# Altium PCB PCB1.PcbDoc (part 1 of 2)
Units mm, origin at the board's own origin, x right, y up, seen from the top; angles counter-clockwise.
Board outline 195 x 95 mm, 2 copper layers (Top Layer, Bottom Layer), stack 1.571 mm thick; 477 components, 312 nets, 1623 pads, 26 vias.
Unrouted connection lines stored in the file: 1219.
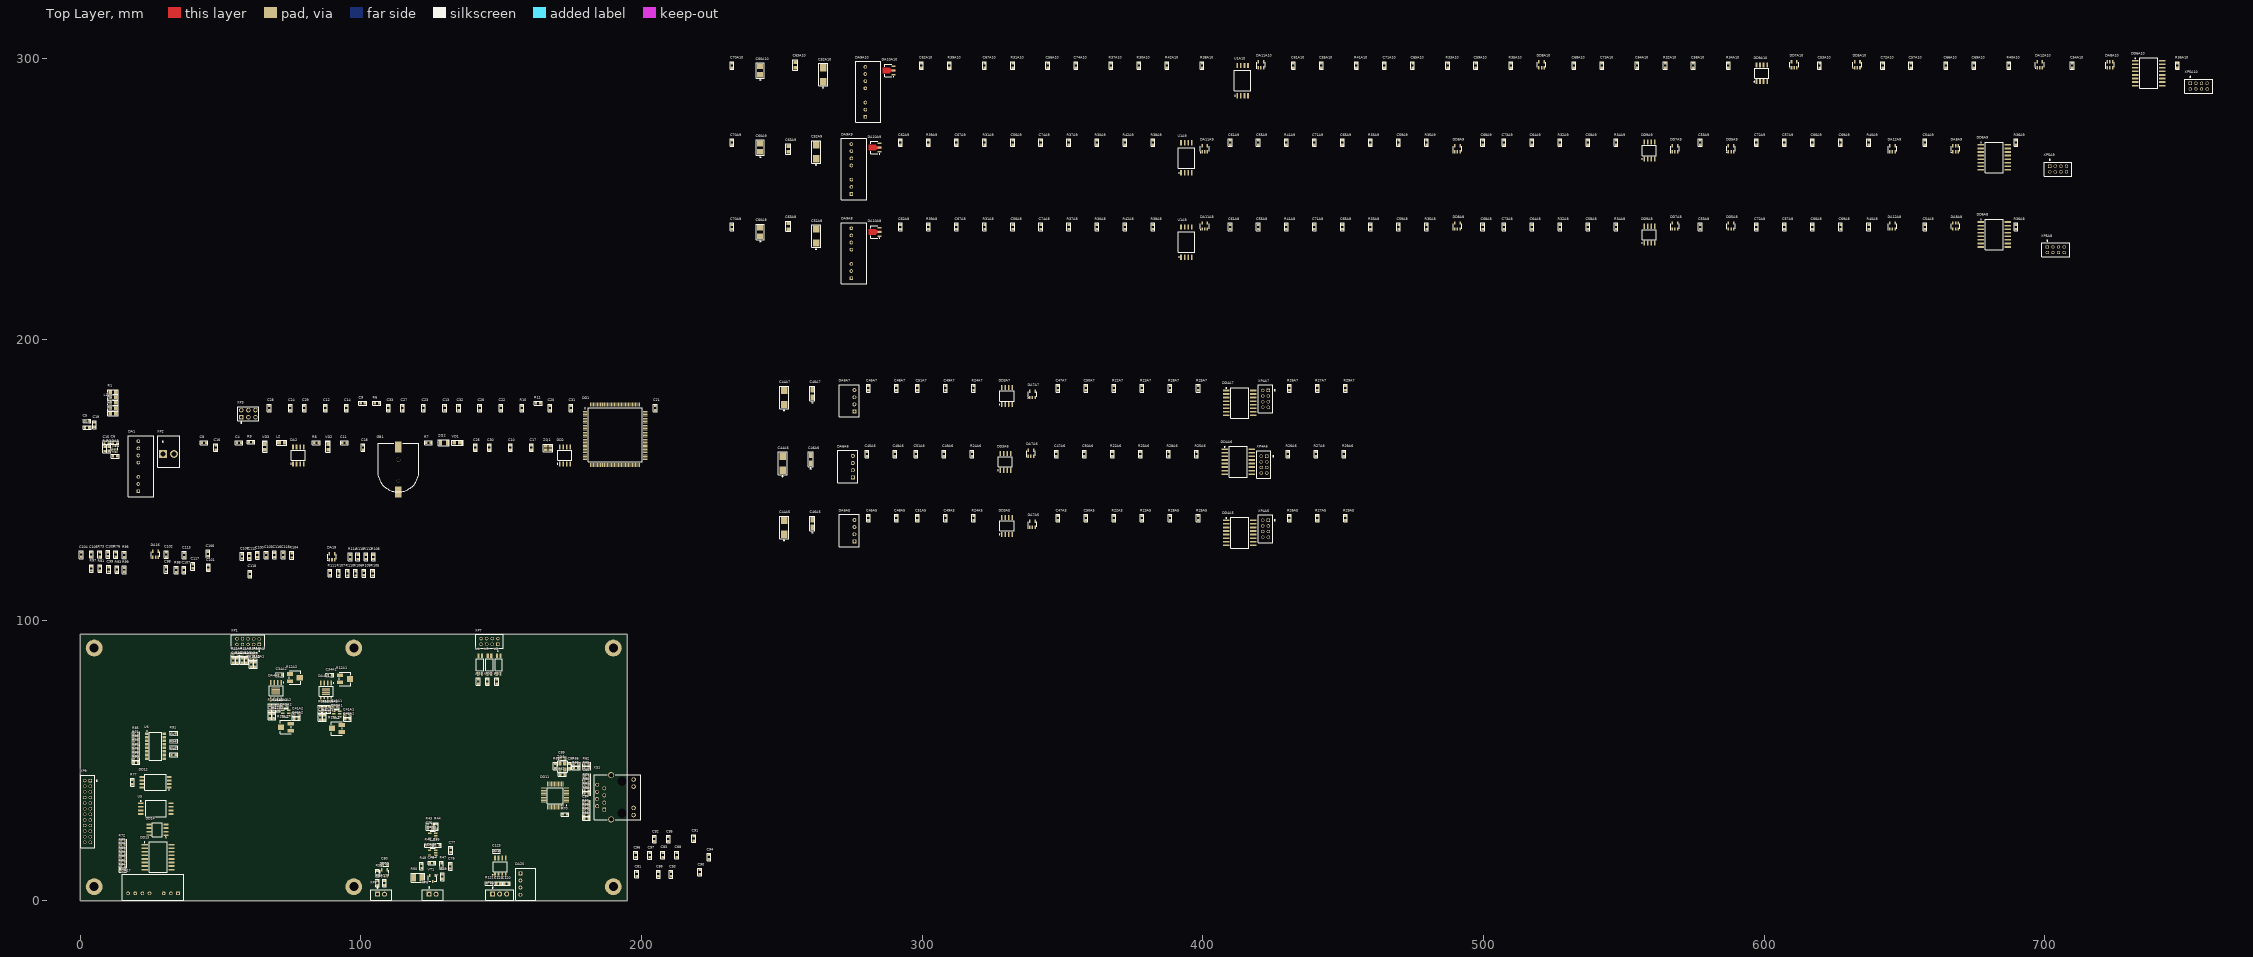
[diagram p0: Top Layer view]
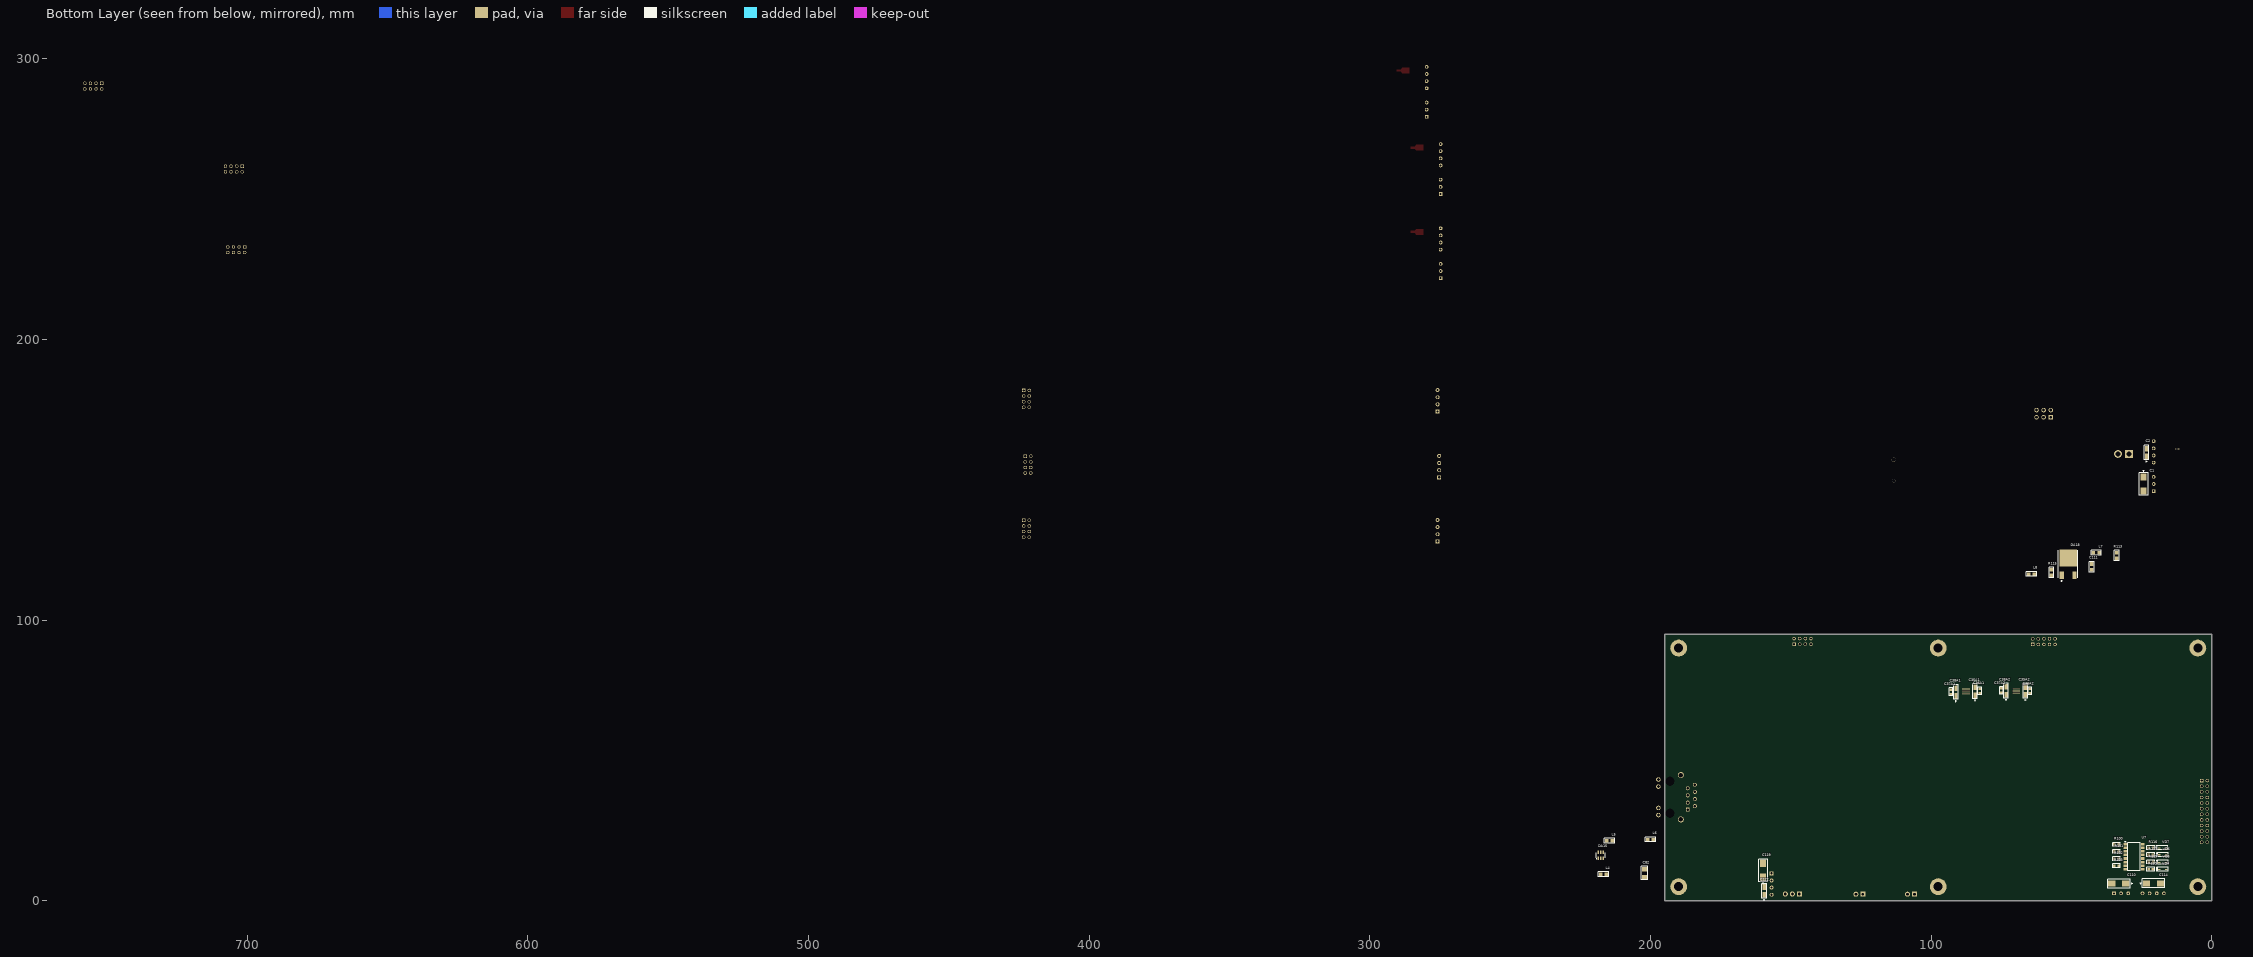
[diagram p1: Bottom Layer view, seen from below]

## Layer stack, top to bottom
Top Solder: solder mask 0.0102, Solder Resist, Dk 3.5
Top Layer: signal copper 0.0356
Dielectric 1: dielectric 1.5, FR-4, Dk 4.8
Bottom Layer: signal copper 0.0356
Bottom Solder: solder mask 0.0102, Solder Resist, Dk 3.5

## Board outline
0,0 195,0 195,95 0,95

## Design rules (kind name [scope] priority, off if disabled: settings)
BoardOutlineClearance [(OnLayer('Bottom Layer') AND OnLayer('Top Layer'))] p1: gap=0.2 ignorepadtopadclearanceinfootprint=FALSE
Clearance [All] p1: gap=0.2 ignorepadtopadclearanceinfootprint=TRUE except(0.3: SMDPad-Poly THPad-Poly)
DiffPairsRouting [All] p1: maxlimit=0.254 minlimit=0.254 mostfreqgap=0.254 toplayer_minwidth=0.381 toplayer_maxwidth=0.381 toplayer_prefwidth=0.381 bottomlayer_minwidth=0.381 bottomlayer_maxwidth=0.381 bottomlayer_prefwidth=0.381 maxuncoupledlength=12.7
Height [(OnLayer('Bottom Layer'))] p1: minheight=0 maxheight=3 prefheight=3
HoleSize [All] p1: absolutevalues=TRUE maxlimit=10 minlimit=0.2 maxpercent=80.000 minpercent=20.000
PlaneClearance [All] p1: clearance=0.5
PlaneConnect [All] p1: planeconnectstyle=Relief reliefexpansion=0.5 reliefentries=4 reliefconductorwidth=0.25 reliefairgap=0.25
PolygonConnect [All] p1: thpad.connectstyle=Relief thpad.reliefconductorwidth=0.5 thpad.reliefentries=4 thpad.polygonreliefangle="90 Angle" thpad.airgapwidth=0.25 smdpad.connectstyle=Relief smdpad.reliefconductorwidth=0.5 smdpad.reliefentries=4 smdpad.polygonreliefangle="90 Angle" smdpad.airgapwidth=0.25 via.connectstyle=Direct via.reliefconductorwidth=0.254 via.reliefentries=4 via.polygonreliefangle="90 Angle" via.airgapwidth=0.152
RoutingCorners [All] p1: cornerstyle=Round minsetback=0.254 maxsetback=2.54
RoutingVias [All] p1: holewidth=0.2 width=0.5 viastyle="Through Hole" minholewidth=0.2 minwidth=0.5 maxholewidth=1 maxwidth=1
SolderMaskExpansion [All] p1: expansion=0.102 istentingtop=FALSE
Width [All] p1: maxlimit=1 minlimit=0.2 preferedwidth=0.3 minimp=50.000000 maximp=50.000000 favimp=50.000000
24 further rules are at their usual default settings.

## Classes and differential pairs
differential pair class TD: TXO
differential pair class RD: RXI
channel class Thermistor: A3 A4
channel class Power_supply: A5 A6 A7
channel class Photodiode: A1 A2
channel class LD_driver: A8 A9 A10
component class Main: C1 C2 C3 C4 C5 C6 C7 C8 C9 C10 C11 C12 C13 C14 C15 C16 C17 C18 C19 C20 C21 C22 C23 C24 C25 C26 C27 C28 C29 C30 C31 C32 C33 DA1 DA2 DA3 DD1 DD2 GB1 L1 L2 L3 R1 R2 R3 R4 R5 R6 R7 R8 R9 R10 R11 VD1 VD2 VD3 XP1 XP2 XP3 ZQ1 ZQ2
component class A16: C119 C120 C121 C122 C123 DA20 DD15 R121 XP10
component class A15: C98 C99 C100 C101 C102 C103 C104 C105 C106 C107 C108 C109 C110 C111 C112 C113 C114 C115 C116 C117 C118 DA16 DA17 DA18 DA19 DD12 DD13 DD14 L7 L8 R71 R72 R73 R74 R75 R76 R77 R78 R79 R80 R81 R82 R83 R84 R85 R86 R87 R88 R89 R90 R91 R92 R93 R94 R95 R96 R97 R98 R99 R100 R101 R102 R103 R104 R105 R106 R107 R108 R109 R110 R111 R112 R113 R114 R115 R116 R117 R118 R119 R120 U5 U6 U7 VD4 VD5 VD6 VD7 XP9
component class A14: C81 C82 C83 C84 C85 C86 C87 C88 C89 C90 C91 C92 C93 C94 C95 C96 C97 DA15 DD11 L4 L5 L6 R56 R57 R58 R59 R60 R61 R62 R63 R64 R65 R66 R67 R68 R69 R70 XS1 ZQ3
component class A13: C79 C80 DD10 R54 R55 XP8
component class A12: R51 R52 R53 U2 U3 U4 XP7
component class A11: C75 C76 C77 C78 DA13 DA14 R43 R44 R45 R46 R47 R48 R49 R50 VT1 XP6
component class A10: C52A10 C53A10 C54A10 C55A10 C56A10 C57A10 C58A10 C59A10 C60A10 C61A10 C62A10 C63A10 C64A10 C65A10 C66A10 C67A10 C68A10 C69A10 C70A10 C71A10 C72A10 C73A10 C74A10 DA8A10 DA9A10 DA10A10 DA11A10 DA12A10 DD5A10 DD6A10 DD7A10 DD8A10 DD9A10 R30A10 R31A10 R32A10 R33A10 R34A10 R35A10 R36A10 R37A10 R38A10 R39A10 R40A10 R41A10 R42A10 U1A10 XP5A10
component class A9: C52A9 C53A9 C54A9 C55A9 C56A9 C57A9 C58A9 C59A9 C60A9 C61A9 C62A9 C63A9 C64A9 C65A9 C66A9 C67A9 C68A9 C69A9 C70A9 C71A9 C72A9 C73A9 C74A9 DA8A9 DA9A9 DA10A9 DA11A9 DA12A9 DD5A9 DD6A9 DD7A9 DD8A9 DD9A9 R30A9 R31A9 R32A9 R33A9 R34A9 R35A9 R36A9 R37A9 R38A9 R39A9 R40A9 R41A9 R42A9 U1A9 XP5A9
component class A8: C52A8 C53A8 C54A8 C55A8 C56A8 C57A8 C58A8 C59A8 C60A8 C61A8 C62A8 C63A8 C64A8 C65A8 C66A8 C67A8 C68A8 C69A8 C70A8 C71A8 C72A8 C73A8 C74A8 DA8A8 DA9A8 DA10A8 DA11A8 DA12A8 DD5A8 DD6A8 DD7A8 DD8A8 DD9A8 R30A8 R31A8 R32A8 R33A8 R34A8 R35A8 R36A8 R37A8 R38A8 R39A8 R40A8 R41A8 R42A8 U1A8 XP5A8
component class A7: C44A7 C45A7 C46A7 C47A7 C48A7 C49A7 C50A7 C51A7 DA6A7 DA7A7 DD3A7 DD4A7 R22A7 R23A7 R24A7 R25A7 R26A7 R27A7 R28A7 R29A7 XP4A7
component class A6: C44A6 C45A6 C46A6 C47A6 C48A6 C49A6 C50A6 C51A6 DA6A6 DA7A6 DD3A6 DD4A6 R22A6 R23A6 R24A6 R25A6 R26A6 R27A6 R28A6 R29A6 XP4A6
component class A5: C44A5 C45A5 C46A5 C47A5 C48A5 C49A5 C50A5 C51A5 DA6A5 DA7A5 DD3A5 DD4A5 R22A5 R23A5 R24A5 R25A5 R26A5 R27A5 R28A5 R29A5 XP4A5
component class A4: C43A4 R20A4 R21A4
component class A3: C43A3 R20A3 R21A3
component class A2: C34A2 C35A2 C36A2 C37A2 C38A2 C39A2 C40A2 C41A2 C42A2 DA4A2 DA5A2 R12A2 R13A2 R14A2 R15A2 R16A2 R17A2 R18A2 R19A2
component class A1: C34A1 C35A1 C36A1 C37A1 C38A1 C39A1 C40A1 C41A1 C42A1 DA4A1 DA5A1 R12A1 R13A1 R14A1 R15A1 R16A1 R17A1 R18A1 R19A1
differential pair TXO: +TXO_P -TXO_N
differential pair TD: +TD_P -TD_N
differential pair RXI: +RXI_P -RXI_N
differential pair RD: +RD_P -RD_N

## Components (designator, comment, footprint, x,y, rotation, side; value= is the part's Value field where it differs from the comment)
C1 "10мкФх35B" CAP_C 24.325,150.975 r270 bottom
C2 "10мкФх10B" CAP_A 23.3,158.275 r90 bottom
C3 "0,1мкФ" CAP_0603 1.7,168.575 r0 top
C4 "0,1мкФ" CAP_0603 55.85,163.15 r0 top
C5 "4,7мкФ" CAP_0603 1.625,170.925 r0 top
C6 "4,7мкФ" CAP_0603 11.625,163.275 r0 top
C7 "1мкФ" CAP_0603 13.3,158.325 r180 top
C8 "10мкФ" CAP_0603 43.35,163.15 r0 top
C9 "0,1мкФ" CAP_0603 99.9,177.25 r0 top
C10 "8пФ" CAP_0603 153.35,160.65 r90 top
C11 "18пФ" CAP_0603 93.35,163.15 r0 top
C12 "0,1мкФ" CAP_0603 87.4,174.75 r90 top
C13 "0,1мкФ" CAP_0603 129.9,174.75 r90 top
C14 "0,1мкФ" CAP_0603 94.9,174.75 r90 top
C15 "2,2мкФ" CAP_0603 10.275,163.25 r180 top
C16 "0,1мкФ" CAP_0603 48.35,160.65 r90 top
C17 "8пФ" CAP_0603 160.85,160.65 r90 top
C18 "18пФ" CAP_0603 100.85,160.65 r90 top
C19 "0,1мкФ" CAP_0603 5.15,168.8 r90 top
C20 "2,2мкФ" CAP_0603 167.4,174.75 r90 top
C21 "0,1мкФ" CAP_0603 204.9,174.75 r90 top
C22 "0,1мкФ" CAP_0603 149.9,174.75 r90 top
C23 "0,1мкФ" CAP_0603 122.4,174.75 r90 top
C24 "0,1мкФ" CAP_0603 74.9,174.75 r90 top
C25 "0,1мкФ" CAP_0603 140.85,160.65 r90 top
C26 "0,1мкФ" CAP_0603 142.4,174.75 r90 top
C27 "0,1мкФ" CAP_0603 114.9,174.75 r90 top
C28 "0,1мкФ" CAP_0603 67.4,174.75 r90 top
C29 "2,2мкФ" CAP_0603 79.9,174.75 r90 top
C30 "0,1мкФ" CAP_0603 145.85,160.65 r90 top
C31 "0,1мкФ" CAP_0603 174.9,174.75 r90 top
C32 "0,1мкФ" CAP_0603 134.9,174.75 r90 top
C33 "0,1мкФ" CAP_0603 109.9,174.75 r90 top
C34A1 "22пФ" CAP_0603 89.75,80.4 r180 top (schematic designator C34)
C34A2 "22пФ" CAP_0603 71.95,80.5 r180 top (schematic designator C34)
C35A1 "10мкФх10B" CAP_A 84.375,73.225 r90 bottom (schematic designator C35)
C35A2 "10мкФх10B" CAP_A 66.45,73.3 r90 bottom (schematic designator C35)
C36A1 "0,1мкФ" CAP_0603 82.725,75.525 r270 bottom (schematic designator C36)
C36A2 "0,1мкФ" CAP_0603 64.775,75.5 r270 bottom (schematic designator C36)
C37A1 "0,1мкФ" CAP_0603 92.975,73.6 r90 bottom (schematic designator C37)
C37A2 "0,1мкФ" CAP_0603 74.975,74.075 r90 bottom (schematic designator C37)
C38A1 "10мкФх10B" CAP_A 91.175,72.925 r90 bottom (schematic designator C38)
C38A2 "10мкФх10B" CAP_A 73.325,73.4 r90 bottom (schematic designator C38)
C39A1 "0,1мкФ" CAP_0603 85.575,64.425 r90 top (schematic designator C39)
C39A2 "0,1мкФ" CAP_0603 67.625,65 r90 top (schematic designator C39)
C40A1 "22пФ" CAP_0603 90.1,69.1 r0 top (schematic designator C40)
C40A2 "22пФ" CAP_0603 71.975,69.425 r0 top (schematic designator C40)
C41A1 "0,1мкФ" CAP_0603 94.425,66.05 r0 top (schematic designator C41)
C41A2 "0,1мкФ" CAP_0603 76.225,66.4 r0 top (schematic designator C41)
C42A1 "2,2мкФ" CAP_0603 94.425,64.6 r0 top (schematic designator C42)
C42A2 "2,2мкФ" CAP_0603 76.225,64.925 r0 top (schematic designator C42)
C43A3 "0,1мкФ" CAP_0603 57.775,86.375 r270 top (schematic designator C43)
C43A4 "0,1мкФ" CAP_0603 54.575,86.375 r270 top (schematic designator C43)
C44A5 "10мкФх35B" CAP_C 250.875,130.525 r90 top (schematic designator C44)
C44A6 "10мкФх35B" CAP_C 250.325,153.35 r90 top (schematic designator C44)
C44A7 "10мкФх35B" CAP_C 250.875,176.8 r90 top (schematic designator C44)
C45A5 "0,1мкФ" CAP_0603 280.875,135.525 r90 top (schematic designator C45)
C45A6 "0,1мкФ" CAP_0603 280.325,158.35 r90 top (schematic designator C45)
C45A7 "0,1мкФ" CAP_0603 280.875,181.8 r90 top (schematic designator C45)
C46A5 "10мкФх10B" CAP_A 260.875,133.025 r90 top (schematic designator C46)
C46A6 "10мкФх10B" CAP_A 260.325,155.85 r90 top (schematic designator C46)
C46A7 "10мкФх10B" CAP_A 260.875,179.3 r90 top (schematic designator C46)
C47A5 "0,1мкФ" CAP_0603 348.375,135.525 r90 top (schematic designator C47)
C47A6 "0,1мкФ" CAP_0603 347.825,158.35 r90 top (schematic designator C47)
C47A7 "0,1мкФ" CAP_0603 348.375,181.8 r90 top (schematic designator C47)
C48A5 "0,1мкФ" CAP_0603 290.875,135.525 r90 top (schematic designator C48)
C48A6 "0,1мкФ" CAP_0603 290.325,158.35 r90 top (schematic designator C48)
C48A7 "0,1мкФ" CAP_0603 290.875,181.8 r90 top (schematic designator C48)
C49A5 "10нФ" CAP_0603 308.375,135.525 r90 top (schematic designator C49)
C49A6 "10нФ" CAP_0603 307.825,158.35 r90 top (schematic designator C49)
C49A7 "10нФ" CAP_0603 308.375,181.8 r90 top (schematic designator C49)
C50A5 "0,1мкФ" CAP_0603 358.375,135.525 r90 top (schematic designator C50)
C50A6 "0,1мкФ" CAP_0603 357.825,158.35 r90 top (schematic designator C50)
C50A7 "0,1мкФ" CAP_0603 358.375,181.8 r90 top (schematic designator C50)
C51A5 "0,1мкФ" CAP_0603 298.375,135.525 r90 top (schematic designator C51)
C51A6 "0,1мкФ" CAP_0603 297.825,158.35 r90 top (schematic designator C51)
C51A7 "0,1мкФ" CAP_0603 298.375,181.8 r90 top (schematic designator C51)
C52A8 "10мкФх35B" CAP_C 262.275,234.3 r90 top (schematic designator C52)
C52A9 "10мкФх35B" CAP_C 262.275,264.3 r90 top (schematic designator C52)
C52A10 "10мкФх35B" CAP_C 264.775,291.8 r90 top (schematic designator C52)
C53A8 "0,1мкФ" CAP_0603 577.275,239.3 r90 top (schematic designator C53)
C53A9 "0,1мкФ" CAP_0603 577.275,269.3 r90 top (schematic designator C53)
C53A10 "0,1мкФ" CAP_0603 619.775,296.8 r90 top (schematic designator C53)
C54A8 "0,1мкФ" CAP_0603 657.275,239.3 r90 top (schematic designator C54)
C54A9 "0,1мкФ" CAP_0603 657.275,269.3 r90 top (schematic designator C54)
C54A10 "0,1мкФ" CAP_0603 709.775,296.8 r90 top (schematic designator C54)
C55A8 "0,1мкФ" CAP_0603 419.775,239.3 r90 top (schematic designator C55)
C55A9 "0,1мкФ" CAP_0603 419.775,269.3 r90 top (schematic designator C55)
C55A10 "0,1мкФ" CAP_0603 442.275,296.8 r90 top (schematic designator C55)
C56A8 "100пФ" CAP_0603 332.275,239.3 r90 top (schematic designator C56)
C56A9 "100пФ" CAP_0603 332.275,269.3 r90 top (schematic designator C56)
C56A10 "100пФ" CAP_0603 344.775,296.8 r90 top (schematic designator C56)
C57A8 "0,1мкФ" CAP_0603 607.275,239.3 r90 top (schematic designator C57)
C57A9 "0,1мкФ" CAP_0603 607.275,269.3 r90 top (schematic designator C57)
C57A10 "0,1мкФ" CAP_0603 652.275,296.8 r90 top (schematic designator C57)
C58A8 "1мкФ" CAP_0603 537.275,239.3 r90 top (schematic designator C58)
C58A9 "1мкФ" CAP_0603 537.275,269.3 r90 top (schematic designator C58)
C58A10 "1мкФ" CAP_0603 574.775,296.8 r90 top (schematic designator C58)
C59A8 "1мкФ" CAP_0603 469.775,239.3 r90 top (schematic designator C59)
C59A9 "1мкФ" CAP_0603 469.775,269.3 r90 top (schematic designator C59)
C59A10 "1мкФ" CAP_0603 497.275,296.8 r90 top (schematic designator C59)
C60A8 "10мкФх25B" CAP_B 242.275,236.8 r90 top (schematic designator C60)
C60A9 "10мкФх25B" CAP_B 242.275,266.8 r90 top (schematic designator C60)
C60A10 "10мкФх25B" CAP_B 242.275,294.3 r90 top (schematic designator C60)
C61A8 "0,1мкФ" CAP_0603 409.775,239.3 r90 top (schematic designator C61)
C61A9 "0,1мкФ" CAP_0603 409.775,269.3 r90 top (schematic designator C61)
C61A10 "0,1мкФ" CAP_0603 432.275,296.8 r90 top (schematic designator C61)
C62A8 "100пФ" CAP_0603 292.275,239.3 r90 top (schematic designator C62)
C62A9 "100пФ" CAP_0603 292.275,269.3 r90 top (schematic designator C62)
C62A10 "100пФ" CAP_0603 299.775,296.8 r90 top (schematic designator C62)
C63A8 "0,33мкФ" CAP_0805 252.275,239.3 r90 top (schematic designator C63)
C63A9 "0,33мкФ" CAP_0805 252.275,266.8 r90 top (schematic designator C63)
C63A10 "0,33мкФ" CAP_0805 254.775,296.8 r90 top (schematic designator C63)
C64A8 "0,1мкФ" CAP_0603 517.275,239.3 r90 top (schematic designator C64)
C64A9 "0,1мкФ" CAP_0603 517.275,269.3 r90 top (schematic designator C64)
C64A10 "0,1мкФ" CAP_0603 554.775,296.8 r90 top (schematic designator C64)
C65A8 "0,1мкФ" CAP_0603 449.775,239.3 r90 top (schematic designator C65)
C65A9 "0,1мкФ" CAP_0603 449.775,269.3 r90 top (schematic designator C65)
C65A10 "0,1мкФ" CAP_0603 474.775,296.8 r90 top (schematic designator C65)
C66A8 "0,1мкФ" CAP_0603 617.275,239.3 r90 top (schematic designator C66)
C66A9 "0,1мкФ" CAP_0603 617.275,269.3 r90 top (schematic designator C66)
C66A10 "0,1мкФ" CAP_0603 664.775,296.8 r90 top (schematic designator C66)
C67A8 "0,1мкФ" CAP_0603 312.275,239.3 r90 top (schematic designator C67)
C67A9 "0,1мкФ" CAP_0603 312.275,269.3 r90 top (schematic designator C67)
C67A10 "0,1мкФ" CAP_0603 322.275,296.8 r90 top (schematic designator C67)
C68A8 "0,1мкФ" CAP_0603 499.775,239.3 r90 top (schematic designator C68)
C68A9 "0,1мкФ" CAP_0603 499.775,269.3 r90 top (schematic designator C68)
C68A10 "0,1мкФ" CAP_0603 532.275,296.8 r90 top (schematic designator C68)
C69A8 "10нФ" CAP_0603 627.275,239.3 r90 top (schematic designator C69)
C69A9 "10нФ" CAP_0603 627.275,269.3 r90 top (schematic designator C69)
C69A10 "10нФ" CAP_0603 674.775,296.8 r90 top (schematic designator C69)
C70A8 "0,1мкФ" CAP_0603 232.275,239.3 r90 top (schematic designator C70)
C70A9 "0,1мкФ" CAP_0603 232.275,269.3 r90 top (schematic designator C70)
C70A10 "0,1мкФ" CAP_0603 232.275,296.8 r90 top (schematic designator C70)
C71A8 "100пФ" CAP_0603 439.775,239.3 r90 top (schematic designator C71)
C71A9 "100пФ" CAP_0603 439.775,269.3 r90 top (schematic designator C71)
C71A10 "100пФ" CAP_0603 464.775,296.8 r90 top (schematic designator C71)
C72A8 "0,1мкФ" CAP_0603 597.275,239.3 r90 top (schematic designator C72)
C72A9 "0,1мкФ" CAP_0603 597.275,269.3 r90 top (schematic designator C72)
C72A10 "0,1мкФ" CAP_0603 642.275,296.8 r90 top (schematic designator C72)
C73A8 "0,1мкФ" CAP_0603 507.275,239.3 r90 top (schematic designator C73)
C73A9 "0,1мкФ" CAP_0603 507.275,269.3 r90 top (schematic designator C73)
C73A10 "0,1мкФ" CAP_0603 542.275,296.8 r90 top (schematic designator C73)
C74A8 "0,1мкФ" CAP_0603 342.275,239.3 r90 top (schematic designator C74)
C74A9 "0,1мкФ" CAP_0603 342.275,269.3 r90 top (schematic designator C74)
C74A10 "0,1мкФ" CAP_0603 354.775,296.8 r90 top (schematic designator C74)
C75 "1мкФ" CAP_0603 125.425,25.725 r180 top
C76 "0,1мкФ" CAP_0603 131.925,11.45 r90 top
C77 "0,1мкФ" CAP_0603 132.05,17.2 r90 top
C78 "100пФ" CAP_0603 126.15,13.375 r180 top
C79 "1мкФ" CAP_0603 108.475,7.075 r270 top
C80 "0,1мкФ" CAP_0603 107.85,12.9 r0 top
C81 "0,1мкФ" CAP_0603 198.325,8.7 r90 top
C82 "1нФх2кВ" CAP_1206 202.15,8.4 r90 bottom
C83 "0,1мкФ" CAP_0603 207.6,15.475 r90 top
C84 "0,1мкФ" CAP_0603 179.625,35.15 r0 top
C85 "0,1мкФ" CAP_0603 179.775,44.525 r0 top
C86 "0,1мкФ" CAP_0603 206.075,8.65 r90 top
C87 "8пФ" CAP_0603 174.375,47.175 r90 top locked
C88 "0,1мкФ" CAP_0603 212.6,15.475 r90 top
C89 "8пФ" CAP_0603 171.025,50.7 r0 top locked
C90 "0,1мкФ" CAP_0603 220.775,9.375 r90 top
C91 "0,1мкФ" CAP_0603 218.65,21.375 r90 top
C92 "0,1мкФ" CAP_0603 204.6,21.175 r90 top
C93 "0,1мкФ" CAP_0603 210.575,8.65 r90 top
C94 "0,1мкФ" CAP_0603 224.025,14.725 r90 top
C95 "0,1мкФ" CAP_0603 209.6,21.175 r90 top
C96 "0,1мкФ" CAP_0603 197.975,15.4 r90 top
C97 "0,1мкФ" CAP_0603 202.975,15.4 r90 top
C98 "0,1мкФ" CAP_0603 30.65,117.25 r90 top
C99 "100пФ" CAP_0603 10.175,117.25 r90 top
C100 "0,1мкФ" CAP_0603 63.2,122.3 r90 top
C101 "0,1мкФ" CAP_0603 45.75,117.875 r90 top
C102 "0,1мкФ" CAP_0603 30.675,122.55 r90 top
C103 "0,1мкФ" CAP_0603 66.325,122.375 r90 top
C104 "100пФ" CAP_0603 0.4,122.475 r90 top
C105 "0,1мкФ" CAP_0603 4,122.525 r90 top
C106 "0,1мкФ" CAP_0603 45.5,122.775 r90 top
C107 "100пФ" CAP_0603 36.95,117 r90 top
C108 "0,1мкФ" CAP_0603 57.725,121.9 r90 top
C109 "0,1мкФ" CAP_0603 9.9,122.625 r90 top
C110 "10мкФх35B" CAP_C 30.65,6.1 r0 bottom
C111 "0,33мкФ" CAP_0805 42.775,117.95 r90 bottom
C112 "0,1мкФ" CAP_0603 60.375,121.95 r90 top
C113 "0,1мкФ" CAP_0603 37.125,122.325 r90 top
C114 "10мкФх35B" CAP_C 23.3,6.125 r180 bottom
C115 "1мкФ" CAP_0603 72.35,122.425 r90 top
C116 "0,1мкФ" CAP_0603 69.275,122.425 r90 top
C117 "0,1мкФ" CAP_0603 40.125,118.35 r90 top
C118 "0,1мкФ" CAP_0603 60.5,115.6 r90 top
C119 "10мкФх35B" CAP_C 159.9,8.3 r90 bottom
C120 "0,1мкФ" CAP_0603 151.15,6.1 r0 top
C121 "0,1мкФ" CAP_0603 149.775,6.1 r180 top
C122 "10мкФх10B" CAP_A 159.5,2.05 r90 bottom
C123 "0,1мкФ" CAP_0603 147.55,17.625 r0 top
DA1 "TMR 6-2411" "TMR3 (SIP-8)" 20.725,145.92 r90 top
DA2 "LD1117D33CTR" SOIC-8 75.85,155.65 r90 top
DA3 "LM27761DSGR" WSON-8 13.125,161.95 r270 top
DA4A1 "ADA4817-1ARDZ" "SOIC-8 EPAD" 89.5,77.6 r270 top (schematic designator DA4)
DA4A2 "ADA4817-1ARDZ" "SOIC-8 EPAD" 71.675,77.725 r270 top (schematic designator DA4)
DA5A1 "TLV3501AIDBVR" SOT-23-6 90.325,67.5 r0 top (schematic designator DA5)
DA5A2 "TLV3501AIDBVR" SOT-23-6 72.2,67.8 r0 top (schematic designator DA5)
DA6A5 "TME 2405S" "TME (SIP-4)" 275.875,128.025 r90 top (schematic designator DA6)
DA6A6 "TME 2405S" "TME (SIP-4)" 275.325,150.85 r90 top (schematic designator DA6)
DA6A7 "TME 2405S" "TME (SIP-4)" 275.875,174.3 r90 top (schematic designator DA6)
DA7A5 "LMC7101BIM5" SOT-23-5 338.375,133.025 r90 top (schematic designator DA7)
DA7A6 "LMC7101BIM5" SOT-23-5 337.825,158.35 r90 top (schematic designator DA7)
DA7A7 "LMC7101BIM5" SOT-23-5 338.375,179.3 r90 top (schematic designator DA7)
DA8A8 "SN74LVC1G3157DBV" SOT-23-6 667.275,239.3 r90 top (schematic designator DA8)
DA8A9 "SN74LVC1G3157DBV" SOT-23-6 667.275,266.8 r90 top (schematic designator DA8)
DA8A10 "SN74LVC1G3157DBV" SOT-23-6 722.275,296.8 r90 top (schematic designator DA8)
DA9A8 "TMR 2412" "TMR3 (SIP-8)" 274.775,221.8 r90 top (schematic designator DA9)
DA9A9 "TMR 2412" "TMR3 (SIP-8)" 274.775,251.8 r90 top (schematic designator DA9)
DA9A10 "TMR 2412" "TMR3 (SIP-8)" 279.775,279.3 r90 top (schematic designator DA9)
DA10A8 "L78L05ABUTR" SOT-89 284.775,236.8 r90 top (schematic designator DA10)
DA10A9 "L78L05ABUTR" SOT-89 284.775,266.8 r90 top (schematic designator DA10)
DA10A10 "L78L05ABUTR" SOT-89 289.775,294.3 r90 top (schematic designator DA10)
DA11A8 "LMC7101BIM5" SOT-23-5 399.775,239.3 r90 top (schematic designator DA11)
DA11A9 "LMC7101BIM5" SOT-23-5 399.775,266.8 r90 top (schematic designator DA11)
DA11A10 "LMC7101BIM5" SOT-23-5 419.775,296.8 r90 top (schematic designator DA11)
DA12A8 "LMC7101BIM5" SOT-23-5 644.775,239.3 r90 top (schematic designator DA12)
DA12A9 "LMC7101BIM5" SOT-23-5 644.775,266.8 r90 top (schematic designator DA12)
DA12A10 "LMC7101BIM5" SOT-23-5 697.275,296.8 r90 top (schematic designator DA12)
DA13 "LMC7101BIM5" SOT-23-5 126.775,22.175 r180 top
DA14 "LMC7101BIM5" SOT-23-5 126.65,16.125 r180 top
DA15 "TPD4S009DBVR" SOT-23-6 218.7,15.125 r90 bottom
DA16 "LMC7101BIM5" SOT-23-5 25.925,122.35 r90 top
DA17 "TMR 4-2415" "TMR4 (SIP-8)" 34.88,2.625 r180 top
DA18 "L78M05CDT-TR" TO-252 53.5,115.95 r180 bottom
DA19 "LM7301IM5X/NOPB" SOT-23-5 88.8,121.425 r90 top
DA20 "TME 2405S" "TME (SIP-4)" 156.875,9.73 r270 top
DD1 "STM32F405ZGT6" LQFP-144 179.9,174.75 r0 top
DD2 "W25Q16JVSNIQ" SOIC-8 170.85,155.65 r90 top
DD3A5 "ADUM1100BR" SOIC-8 328.375,130.525 r90 top (schematic designator DD3)
DD3A6 "ADUM1100BR" SOIC-8 327.825,153.35 r90 top (schematic designator DD3)
DD3A7 "ADUM1100BR" SOIC-8 328.375,176.8 r90 top (schematic designator DD3)
DD4A5 "ADUM1401CRW" SOIC-16W 408.375,135.525 r0 top (schematic designator DD4)
DD4A6 "ADUM1401CRW" SOIC-16W 407.825,160.85 r0 top (schematic designator DD4)
DD4A7 "ADUM1401CRW" SOIC-16W 408.375,181.8 r0 top (schematic designator DD4)
DD5A8 "SN74LVC1G08DBV" SOT-23-5 587.275,239.3 r90 top (schematic designator DD5)
DD5A9 "SN74LVC1G08DBV" SOT-23-5 587.275,266.8 r90 top (schematic designator DD5)
DD5A10 "SN74LVC1G08DBV" SOT-23-5 632.275,296.8 r90 top (schematic designator DD5)
DD6A8 "ADUM1400CRW" SOIC-16W 677.275,241.8 r0 top (schematic designator DD6)
DD6A9 "ADUM1400CRW" SOIC-16W 677.275,269.3 r0 top (schematic designator DD6)
DD6A10 "ADUM1400CRW" SOIC-16W 732.275,299.3 r0 top (schematic designator DD6)
DD7A8 "SN74LVC1G17DBV" SOT-23-5 567.275,239.3 r90 top (schematic designator DD7)
DD7A9 "SN74LVC1G17DBV" SOT-23-5 567.275,266.8 r90 top (schematic designator DD7)
DD7A10 "SN74LVC1G17DBV" SOT-23-5 609.775,296.8 r90 top (schematic designator DD7)
DD8A8 "SN74LVC1G17DBV" SOT-23-5 489.775,239.3 r90 top (schematic designator DD8)
DD8A9 "SN74LVC1G17DBV" SOT-23-5 489.775,266.8 r90 top (schematic designator DD8)
DD8A10 "SN74LVC1G17DBV" SOT-23-5 519.775,296.8 r90 top (schematic designator DD8)
DD9A8 "ADUM1200CR" SOIC-8 557.275,234.3 r90 top (schematic designator DD9)
DD9A9 "ADUM1200CR" SOIC-8 557.275,264.3 r90 top (schematic designator DD9)
DD9A10 "ADUM1200CR" SOIC-8 597.275,291.8 r90 top (schematic designator DD9)
DD10 "SN74LVC1G17DBV" SOT-23-5 107.525,8.8 r90 top
DD11 "W5100S-L" LQFP-48 173.3,34.7 r180 top locked
DD12 "ADM3050EBRIZ" "SOIC-8 RI-8-1" 31.7,40.305 r180 top
DD13 "ADUM1400CRW" SOIC-16W 22.95,19.955 r0 top
DD14 "ADUM1100BR" SOIC-8 30.55,23.325 r180 top
DD15 "ADUM1100BR" SOIC-8 147.8,9.15 r90 top
GB1 "DS1092-12-N8S" DS1092-12-N8S 113.35,145.65 r90 top
L1 "BLM21PG221SN1D" IND_0805 12.75,179.325 r180 top
L2 "BLM21PG221SN1D" IND_0805 70.85,163.15 r0 top
L3 "BLM21PG221SN1D" IND_0805 12.75,175.475 r180 top
L4 "BLM21PG221SN1D" IND_0805 217.775,9.375 r180 bottom
L5 "BLM21PG221SN1D" IND_0805 215.65,21.375 r180 bottom
L6 "BLM21PG221SN1D" IND_0805 201,21.775 r180 bottom
L7 "BLM21PG221SN1D" IND_0805 42.2,123.95 r180 bottom
L8 "BLM21PG221SN1D" IND_0805 65.3,116.375 r180 bottom
R1 "0" RES_0805 10.75,181.25 r0 top
R2 "0" RES_0805 12.75,177.4 r180 top
R3 "133к" RES_0603 10.225,160.225 r90 top
R4 "50к" RES_0603 8.75,161.8 r270 top
R5 "0" RES_0805 12.75,173.55 r180 top
R6 "10к" RES_0603 104.9,177.25 r0 top
R7 "200" RES_0603 123.35,163.15 r0 top
R8 "200" RES_0603 83.35,163.15 r0 top
R9 "200" RES_0603 60.125,163.4 r0 top
R10 "10к" RES_0603 157.4,174.75 r90 top
R11 "0" RES_0603 162.4,177.25 r0 top
R12A1 "2М" 3224W 92.65,80.3 r180 top (schematic designator R12)
R12A2 "2М" 3224W 74.8,80.75 r180 top (schematic designator R12)
R13A1 "0" RES_0603 62.45,83.375 r90 top (schematic designator R13)
R13A2 "0" RES_0603 60.975,83.35 r90 top (schematic designator R13)
R14A1 "DNP" RES_0603 62.425,86.3 r90 top (schematic designator R14)
R14A2 "DNP" RES_0603 60.975,86.275 r90 top (schematic designator R14)
R15A1 "5,1к" RES_0603 87.075,69.025 r270 top (schematic designator R15)
R15A2 "5,1к" RES_0603 69.1,69.525 r270 top (schematic designator R15)
R16A1 "10к" RES_0603 85.525,67.425 r90 top (schematic designator R16)
R16A2 "10к" RES_0603 67.625,67.925 r90 top (schematic designator R16)
R17A1 "10к" RES_0603 87.075,66.025 r270 top (schematic designator R17)
R17A2 "10к" RES_0603 69.1,66.6 r270 top (schematic designator R17)
R18A1 "10к" RES_0603 88.575,67.425 r90 top (schematic designator R18)
R18A2 "10к" RES_0603 70.575,67.9 r90 top (schematic designator R18)
R19A1 "10к" 3224W 93.2,60.075 r0 top (schematic designator R19)
R19A2 "10к" 3224W 75.025,60.55 r0 top (schematic designator R19)
R20A3 "10к" RES_0603 59.225,84.775 r90 top (schematic designator R20)
R20A4 "10к" RES_0603 56.025,84.775 r90 top (schematic designator R20)
R21A3 "10к" RES_0603 59.3,87.75 r180 top (schematic designator R21)
R21A4 "10к" RES_0603 56.1,87.75 r180 top (schematic designator R21)
R22A5 "10к" RES_0603 368.375,135.525 r90 top (schematic designator R22)
R22A6 "10к" RES_0603 367.825,158.35 r90 top (schematic designator R22)
R22A7 "10к" RES_0603 368.375,181.8 r90 top (schematic designator R22)
R23A5 "DNP" RES_0603 378.375,135.525 r90 top (schematic designator R23)
R23A6 "DNP" RES_0603 377.825,158.35 r90 top (schematic designator R23)
R23A7 "DNP" RES_0603 378.375,181.8 r90 top (schematic designator R23)
R24A5 "10к" RES_0603 318.375,135.525 r90 top (schematic designator R24)
R24A6 "10к" RES_0603 317.825,158.35 r90 top (schematic designator R24)
R24A7 "10к" RES_0603 318.375,181.8 r90 top (schematic designator R24)
R25A5 "2,4к" RES_0603 398.375,135.525 r90 top (schematic designator R25)
R25A6 "2,4к" RES_0603 397.825,158.35 r90 top (schematic designator R25)
R25A7 "2,4к" RES_0603 398.375,181.8 r90 top (schematic designator R25)
R26A5 "10к" RES_0603 430.875,135.525 r90 top (schematic designator R26)
R26A6 "10к" RES_0603 430.325,158.35 r90 top (schematic designator R26)
R26A7 "10к" RES_0603 430.875,181.8 r90 top (schematic designator R26)
R27A5 "10к" RES_0603 440.875,135.525 r90 top (schematic designator R27)
R27A6 "10к" RES_0603 440.325,158.35 r90 top (schematic designator R27)
R27A7 "10к" RES_0603 440.875,181.8 r90 top (schematic designator R27)
R28A5 "10к" RES_0603 388.375,135.525 r90 top (schematic designator R28)
R28A6 "10к" RES_0603 387.825,158.35 r90 top (schematic designator R28)
R28A7 "10к" RES_0603 388.375,181.8 r90 top (schematic designator R28)
R29A5 "10к" RES_0603 450.875,135.525 r90 top (schematic designator R29)
R29A6 "10к" RES_0603 450.325,158.35 r90 top (schematic designator R29)
R29A7 "10к" RES_0603 450.875,181.8 r90 top (schematic designator R29)
R30A8 "15к" RES_0603 362.275,239.3 r90 top (schematic designator R30)
R30A9 "15к" RES_0603 362.275,269.3 r90 top (schematic designator R30)
R30A10 "15к" RES_0603 377.275,296.8 r90 top (schematic designator R30)
R31A8 "10к" RES_0603 322.275,239.3 r90 top (schematic designator R31)
R31A9 "10к" RES_0603 322.275,269.3 r90 top (schematic designator R31)
R31A10 "10к" RES_0603 332.275,296.8 r90 top (schematic designator R31)
R32A8 "10к" RES_0603 527.275,239.3 r90 top (schematic designator R32)
R32A9 "10к" RES_0603 527.275,269.3 r90 top (schematic designator R32)
R32A10 "10к" RES_0603 564.775,296.8 r90 top (schematic designator R32)
R33A8 "10к" RES_0603 459.775,239.3 r90 top (schematic designator R33)
R33A9 "10к" RES_0603 459.775,269.3 r90 top (schematic designator R33)
R33A10 "10к" RES_0603 487.275,296.8 r90 top (schematic designator R33)
R34A8 "10к" RES_0603 547.275,239.3 r90 top (schematic designator R34)
R34A9 "10к" RES_0603 547.275,269.3 r90 top (schematic designator R34)
R34A10 "10к" RES_0603 587.275,296.8 r90 top (schematic designator R34)
R35A8 "10к" RES_0603 479.775,239.3 r90 top (schematic designator R35)
R35A9 "10к" RES_0603 479.775,269.3 r90 top (schematic designator R35)
R35A10 "10к" RES_0603 509.775,296.8 r90 top (schematic designator R35)
R36A8 "10к" RES_0603 689.775,239.3 r90 top (schematic designator R36)
R36A9 "10к" RES_0603 689.775,269.3 r90 top (schematic designator R36)
R36A10 "10к" RES_0603 747.275,296.8 r90 top (schematic designator R36)
R37A8 "10к" RES_0603 352.275,239.3 r90 top (schematic designator R37)
R37A9 "10к" RES_0603 352.275,269.3 r90 top (schematic designator R37)
R37A10 "10к" RES_0603 367.275,296.8 r90 top (schematic designator R37)
R38A8 "10к" RES_0603 382.275,239.3 r90 top (schematic designator R38)
R38A9 "10к" RES_0603 382.275,269.3 r90 top (schematic designator R38)
R38A10 "10к" RES_0603 399.775,296.8 r90 top (schematic designator R38)
R39A8 "16,5к" RES_0603 302.275,239.3 r90 top (schematic designator R39)
R39A9 "16,5к" RES_0603 302.275,269.3 r90 top (schematic designator R39)
R39A10 "16,5к" RES_0603 309.775,296.8 r90 top (schematic designator R39)
R40A8 "10к" RES_0603 637.275,239.3 r90 top (schematic designator R40)
R40A9 "10к" RES_0603 637.275,269.3 r90 top (schematic designator R40)
R40A10 "10к" RES_0603 687.275,296.8 r90 top (schematic designator R40)
R41A8 "16,5к" RES_0603 429.775,239.3 r90 top (schematic designator R41)
R41A9 "16,5к" RES_0603 429.775,269.3 r90 top (schematic designator R41)
R41A10 "16,5к" RES_0603 454.775,296.8 r90 top (schematic designator R41)
R42A8 "10к" RES_0603 372.275,239.3 r90 top (schematic designator R42)
R42A9 "10к" RES_0603 372.275,269.3 r90 top (schematic designator R42)
R42A10 "10к" RES_0603 387.275,296.8 r90 top (schematic designator R42)
R43 "10к" RES_0603 123.85,27.2 r0 top
R44 "10к" RES_0603 126.975,27.225 r270 top
R45 "12к" RES_0603 128.15,19.75 r180 top
R46 "10к" RES_0603 125,19.7 r180 top
R47 "200" RES_0603 128.8,13.4 r270 top
R48 "10к" RES_0603 121.675,13.2 r270 top
R49 "10к" RES_0603 129.075,7.75 r90 top
R50 "10" RES_1210 118.975,8.225 r0 top
R51 "200" RES_0603 148.45,78.9 r270 top
R52 "200" RES_0603 145.175,78.9 r270 top
R53 "200" RES_0603 141.875,78.9 r270 top
R54 "1к" RES_0603 105.975,5.475 r90 top
R55 "10к" RES_0603 105.975,9.025 r90 top
R56 "49,9" RES_0603 181.225,29.25 r180 top
R57 "49,9" RES_0603 181.225,33.675 r180 top
R58 "49,9" RES_0603 181.275,38.15 r180 top
R59 "49,9" RES_0603 181.3,42.725 r180 top
R60 "3,3" RES_0603 179.625,30.725 r0 top
R61 "3,3" RES_0603 179.675,39.625 r0 top
R62 "1к" RES_0603 181.3,48.712 r180 top locked
R63 "3,3" RES_0603 179.625,32.2 r0 top
R64 "3,3" RES_0603 179.7,41.25 r0 top
R65 "1к" RES_0603 181.3,47.212 r180 top locked
R66 "300" RES_0603 175.95,48.712 r0 top locked
R67 "1М" RES_0603 172.6,44.9 r180 top locked
R68 "12к" RES_0603 177.55,47.212 r180 top locked
R69 "0" RES_0603 169.3,47.175 r90 top
R70 "10к" RES_0603 172,30.75 r0 top locked
R71 "10к" RES_0603 20.75,58.1 r180 top
R72 "10к" RES_0603 16.075,21.225 r180 top
R73 "10к" RES_0603 6.975,122.55 r90 top
R74 "10к" RES_0603 20.75,55.15 r180 top
R75 "10к" RES_0603 16.075,18.275 r180 top
R76 "40,2к" RES_0603 12.675,122.55 r90 top
R77 "120" RES_0603 18.625,43.025 r270 top
R78 "10к" RES_0603 20.75,52.2 r180 top
R79 "10к" RES_0603 16.1,15.3 r180 top
R80 "10к" RES_0603 20.75,49.25 r180 top
R81 "10к" RES_0603 7.05,117.525 r90 top
R82 "10к" RES_0603 16.1,12.3 r180 top
R83 "10к" RES_0603 14.5,16.8 r0 top
R84 "10к" RES_0603 14.5,10.8 r0 top
R85 "390" RES_0603 19.15,59.55 r0 top
R86 "390" RES_0603 19.15,56.625 r0 top
R87 "390" RES_0603 19.15,53.675 r0 top
R88 "390" RES_0603 19.15,50.725 r0 top
R89 "10к" RES_0603 14.475,19.75 r0 top
R90 "10к" RES_0603 14.5,13.825 r0 top
R91 "10к" RES_0603 34.125,59.65 r180 top
R92 "10к" RES_0603 34.125,56.925 r180 top
R93 "10к" RES_0603 13.1,117.2 r90 top
R94 "10к" RES_0603 34.125,54.625 r180 top
R95 "10к" RES_0603 15.7,122.375 r90 top
R96 "10к" RES_0603 34.125,51.975 r180 top
R97 "16,5к" RES_0603 4.075,117.6 r90 top
R98 "16,5к" RES_0603 34.275,117 r90 top
R99 "10к" RES_0603 15.7,117.1 r90 top
R100 "200" RES_0603 33.175,20.05 r0 bottom
R101 "200" RES_0603 33.15,17.5 r0 bottom
R102 "200" RES_0603 33.15,14.925 r0 bottom
R103 "200" RES_0603 33.15,12.425 r0 bottom
R104 "10к" RES_0603 75.425,122.25 r90 top
R105 "0" RES_0603 104.25,115.85 r90 top
R106 "0" RES_0603 98.15,115.85 r90 top
R107 "0" RES_0603 92.1,115.825 r90 top
R108 "0" RES_0603 104.525,121.7 r90 top
R109 "DNP" RES_0603 101.175,115.875 r90 top
R110 "DNP" RES_0603 95.3,115.825 r90 top
R111 "DNP" RES_0603 88.975,115.925 r90 top
R112 "DNP" RES_0603 101.85,121.7 r90 top
R113 "0" RES_0805 33.85,122.025 r90 bottom
R114 "10к" RES_0603 96.25,121.725 r90 top
R115 "0" RES_0805 57.175,115.925 r90 bottom
R116 "10к" RES_0603 20.95,18.85 r0 bottom
R117 "10к" RES_0603 20.975,16.35 r0 bottom
R118 "6,04к" RES_0603 98.925,121.725 r90 top
R119 "10к" RES_0603 20.95,13.75 r0 bottom
R120 "10к" RES_0603 20.975,11.2 r0 bottom
R121 "10к" RES_0603 146.525,6.175 r180 top
U1A8 "ACPL-C87A-500E" SSO-8 392.275,229.3 r90 top (schematic designator U1)
U1A9 "ACPL-C87A-500E" SSO-8 392.275,259.3 r90 top (schematic designator U1)
U1A10 "ACPL-C87A-500E" SSO-8 412.275,286.8 r90 top (schematic designator U1)
U2 "TLP291(GB-TP,SE" 11-3C1 148.475,80.875 r90 top
U3 "TLP291(GB-TP,SE" 11-3C1 145.175,80.875 r90 top
U4 "TLP291(GB-TP,SE" 11-3C1 141.875,80.875 r90 top
U5 "ACPL-C87A-500E" SSO-8 21.625,34.725 r0 top
U6 "TLP291-4" SOP-16 23.75,59.525 r0 top
U7 "TLP291-4" SOP-16 30.88,20.1 r180 bottom
VD1 "KP-2012MGC" LED_0805 133.35,163.15 r0 top
VD2 "KP-2012SYC" LED_0805 88.35,160.65 r90 top
VD3 "KP-2012EC" LED_0805 65.85,160.65 r90 top
VD4 "BZX384-C5V1" SOD-323 18.65,11.15 r180 bottom
VD5 "BZX384-C5V1" SOD-323 18.675,13.625 r180 bottom
VD6 "BZX384-C5V1" SOD-323 18.675,16.35 r180 bottom
VD7 "BZX384-C5V1" SOD-323 18.75,18.825 r180 bottom
VT1 "AO3400A" SOT-23-3 126.525,8.975 r270 top
XP1 "B10B-PHDSS" B10B-PHDSS 63.85,91.3 r0 top
XP2 "B2P-VH" B2P-VH 29.5,159.175 r0 top
XP3 "PLD-6" PLD-6 57.4,172.25 r0 top
XP4A5 "B8B-PHDSS" B8B-PHDSS 423.375,135.525 r90 top (schematic designator XP4)
XP4A6 "B8B-PHDSS" B8B-PHDSS 422.825,158.35 r90 top (schematic designator XP4)
XP4A7 "B8B-PHDSS" B8B-PHDSS 423.375,181.8 r90 top (schematic designator XP4)
XP5A8 "B8B-PHDSS" B8B-PHDSS 700.925,232.925 r180 top (schematic designator XP5)
XP5A9 "B8B-PHDSS" B8B-PHDSS 701.775,261.7 r180 top (schematic designator XP5)
XP5A10 "B8B-PHDSS" B8B-PHDSS 751.875,291.225 r180 top (schematic designator XP5)
XP6 "B2B-EH-A" B2B-EH-A 124.35,2.3 r0 top
XP7 "B8B-PHDSS" B8B-PHDSS 148.85,91.375 r0 top
XP8 "B2B-EH-A" B2B-EH-A 105.975,2.3 r0 top
XP9 "B24B-PHDSS" B24B-PHDSS 3.65,42.775 r90 top
XP10 "B3B-EH-A" B3B-EH-A 146.975,2.35 r0 top
XS1 "LPJD0012BENL" LPJD0012BENL 186.74,32.407 r90 top locked
ZQ1 "16МГц" NX2520SA 165.85,160.65 r0 top
ZQ2 "32,768кГц" NX3215SA 128.35,163.15 r0 top
ZQ3 "25МГц" 7M 172.7,46.7 r90 top locked

## Footprints (in the part's own frame and the unit in brackets; to place one, negate y for a bottom-side part, rotate by r counter-clockwise, add the part's x,y. Pads: shape width x height; smd on the part's side, far side on the other; paste and mask are expansions set on the pad)
7M [mm]
  rect 1.4x1.2 smd: 1(0,0) 2(2.2,0.025) 3(2.2,1.725) 4(0,1.725)
  silkscreen extent -0.92,-0.82 3.13,2.55, body extent -0.55,-0.45 2.75,2.15, height 0.8
11-3C1 [mm]
  rect 1.5x0.8 smd: 1(0,0) 2(0,-1.275) 3(6.4,-1.275) 4(6.4,-0.025)
  silkscreen extent -0.12,-1.95 5.25,1, body extent -0.28,-1.95 6.73,0.65, height 2.2
3224W [mm]
  rect 2.2x1.3 smd: 1(0,0) 3(0,2.525)
  rect 2.2x2 smd: 2(-3.45,1.3)
  silkscreen extent -3.72,-1.12 0.25,3.72, body extent -3.72,-1.12 0.23,3.71, height 5.29
B2B-EH-A [mm]
  rect 1.8x1.8 hole 0.965: 1(0,0)
  round 1.8 hole 1: 2(2.5,0)
  silkscreen extent -2.45,-2.2 5.05,2.6, body extent -2.45,-2.2 5.05,1.6, height 6
B2P-VH [mm]
  rect 2.8x2.8 hole 1.8: 1(0,0)
  round 2.8 hole 1.8: 2(3.96,0)
  silkscreen extent -1.92,-4.75 5.92,6.5, body extent -1.93,-4.75 5.93,3.75, height 10.9
B3B-EH-A [mm]
  rect 1.8x1.8 hole 0.965: 1(0,0)
  round 1.8 hole 1: 2(2.5,0) 3(5,0)
  silkscreen extent -2.5,-2.25 7.5,2.5, body extent -2.5,-2.25 7.5,1.55, height 6
B8B-PHDSS [mm]
  rect 1.2x1.2 hole 0.8: 1(0,0)
  round 1.2 hole 0.8: 2(0,2) 3(-2,0) 4(-2,2) 5(-4,0) 6(-4,2) 7(-6,0) 8(-6,2)
  silkscreen extent -7.93,-2.47 1.97,3.52, body extent -7.93,-1.48 1.97,3.52, height 6.5
B10B-PHDSS [mm]
  rect 1.2x1.2 hole 0.8: 1(0,0)
  round 1.2 hole 0.8: 2(0,2) 3(-2,0) 4(-2,2) 5(-4,0) 6(-4,2) 7(-6,0) 8(-6,2) 9(-8,0) 10(-8,2)
  silkscreen extent -9.92,-2.47 1.95,3.5, body extent -9.95,-1.5 1.95,3.5, height 6.5
B24B-PHDSS [mm]
  rect 1.2x1.2 hole 0.8: 1(0,0)
  round 1.2 hole 0.8: 2(0,2) 3(-2,0) 4(-2,2) 5(-4,0) 6(-4,2) 7(-6,0) 8(-6,2) 9(-8,0) 10(-8,2) 11(-10,0) 12(-10,2) 13(-12,0) 14(-12,2) 15(-14,0) 16(-14,2) 17(-16,0) 18(-16,2) 19(-18,0) 20(-18,2) 21(-20,0) 22(-20,2) 23(-22,0) 24(-22,2)
  silkscreen extent -23.95,-2.47 1.95,3.5, body extent -23.95,-1.5 1.95,3.5, height 6.5
CAP_0603 [mm]
  rect 0.85x0.95 smd: 1(0.025,0) 2(1.575,0)
  silkscreen extent -0.58,-0.65 2.17,0.65, body extent 0.02,-0.43 1.63,0.44, height 0.8
CAP_0805 [mm]
  rect 1.27x1.27 smd: 1(0,0) 2(2,0)
  silkscreen extent -0.85,-0.85 2.85,0.85, body extent 0,-0.63 2,0.62, height 1
CAP_1206 [mm]
  rect 1.6x1.8 smd: 1(0,0) 2(2.8,0)
  silkscreen extent -1.02,-1.12 3.83,1.12, body extent -0.25,-0.77 2.95,0.83, height 0.94
CAP_A [mm]
  rect 2x1.2 smd: 1(0,0) 2(2.8,0)
  silkscreen extent -2.15,-0.82 4.03,0.82, body extent -0.33,-0.8 3.13,0.8, height 1.65
CAP_B [mm]
  rect 2x2.2 smd: 1(0,0) 2(3,0)
  silkscreen extent -2.15,-1.4 4.25,1.4, body extent -0.25,-1.4 3.25,1.4, height 1.9
CAP_C [mm]
  rect 2.6x2.2 smd: 1(0,0) 2(5,0)
  silkscreen extent -2.4,-1.58 6.53,1.6, body extent -0.5,-1.6 5.5,1.6, height 2.5
DS1092-12-N8S [mm]
  rect 3.9x2.4 smd: 1(0,0) 2(16,0)
  round 1.2 hole 1.2: 1(4,0)
  round 1.5 hole 1.5: 1(11.5,0)
  silkscreen extent 0,-7.37 17.4,7.37, body extent -1.4,-7.37 17.4,7.37, height 4.23
IND_0805 [mm]
  rect 1.27x1.27 smd: 1(0,0) 2(2,0)
  silkscreen extent -0.85,-0.85 2.85,0.85, body extent 0,-0.62 2,0.62, height 0.85
LED_0805 [mm]
  rect 1.27x1.27 smd: 1(0,0) 2(2,0)
  silkscreen extent -0.85,-0.85 3.22,0.85, body extent -0.03,-0.46 2.03,0.45, height 0.85
LPJD0012BENL [mm]
  rect 1.4x1.4 hole 0.9: 1(0,0)
  round 1.4 hole 0.9: 2(1.27,2.54) 3(2.54,0) 4(3.81,2.54) 5(5.08,0) 6(6.35,2.54) 7(7.62,0) 8(8.89,2.54)
  round 1.6 hole 1.02: 9(-1.907,-10.46) 10(0.633,-10.46) 11(8.223,-10.46) 12(10.763,-10.46)
  round 2.1 hole 1.6: 13(-3.475,-2.46) 14(12.365,-2.46)
  round 0 hole 3.25 unplated: ""(-1.27,-6.35) ""(10.16,-6.35)
  silkscreen extent -3.57,-13.08 12.42,3.62, body extent -3.57,-13.08 12.42,3.63, height 17.4
LQFP-48 [mm]
  rect 1.8x0.3 smd: 1(0,0) 2(0,-0.5) 3(0,-1) 4(0,-1.5) 5(0,-2) 6(0,-2.5) 7(0,-3) 8(0,-3.5) 9(0,-4) 10(0,-4.5) 11(0,-5) 12(0,-5.5) 25(8.1,-5.5) 26(8.1,-5) 27(8.1,-4.5) 28(8.1,-4) 29(8.1,-3.5) 30(8.1,-3) 31(8.1,-2.5) 32(8.1,-2) 33(8.1,-1.5) 34(8.1,-1) 35(8.1,-0.5) 36(8.1,0)
  rect 0.3x1.8 smd: 13(1.3,-6.8) 14(1.8,-6.8) 15(2.3,-6.8) 16(2.8,-6.8) 17(3.3,-6.8) 18(3.8,-6.8) 19(4.3,-6.8) 20(4.8,-6.8) 21(5.3,-6.8) 22(5.8,-6.8) 23(6.3,-6.8) 24(6.8,-6.8) 37(6.8,1.3) 38(6.3,1.3) 39(5.8,1.3) 40(5.3,1.3) 41(4.8,1.3) 42(4.3,1.3) 43(3.8,1.3) 44(3.3,1.3) 45(2.8,1.3) 46(2.3,1.3) 47(1.8,1.3) 48(1.3,1.3)
  silkscreen extent -0.13,-5.6 6.9,0.92, body extent -0.45,-7.25 8.55,1.75, height 1.6
LQFP-144 [mm]
  rect 1.45x0.3 smd: 1(0,0) 2(0,-0.5) 3(0,-1) 4(0,-1.5) 5(0,-2) 6(0,-2.5) 7(0,-3) 8(0,-3.5) 9(0,-4) 10(0,-4.5) 11(0,-5) 12(0,-5.5) 13(0,-6) 14(0,-6.5) 15(0,-7) 16(0,-7.5) 17(0,-8) 18(0,-8.5) 19(0,-9) 20(0,-9.5) 21(0,-10) 22(0,-10.5) 23(0,-11) 24(0,-11.5) 25(0,-12) 26(0,-12.5) 27(0,-13) 28(0,-13.5) 29(0,-14) 30(0,-14.5) 31(0,-15) 32(0,-15.5) 33(0,-16) 34(0,-16.5) 35(0,-17) 36(0,-17.5) 73(21.45,-17.5) 74(21.45,-17) 75(21.45,-16.5) 76(21.45,-16) 77(21.45,-15.5) 78(21.45,-15) 79(21.45,-14.5) 80(21.45,-14) 81(21.45,-13.5) 82(21.45,-13) 83(21.45,-12.5) 84(21.45,-12) 85(21.45,-11.5) 86(21.45,-11) 87(21.45,-10.5) 88(21.45,-10) 89(21.45,-9.5) 90(21.45,-9) 91(21.45,-8.5) 92(21.45,-8) 93(21.45,-7.5) 94(21.45,-7) 95(21.45,-6.5) 96(21.45,-6) 97(21.45,-5.5) 98(21.45,-5) 99(21.45,-4.5) 100(21.45,-4) 101(21.45,-3.5) 102(21.45,-3) 103(21.45,-2.5) 104(21.45,-2) 105(21.45,-1.5) 106(21.45,-1) 107(21.45,-0.5) 108(21.45,0)
  rect 0.3x1.45 smd: 37(1.975,-19.475) 38(2.475,-19.475) 39(2.975,-19.475) 40(3.475,-19.475) 41(3.975,-19.475) 42(4.475,-19.475) 43(4.975,-19.475) 44(5.475,-19.475) 45(5.975,-19.475) 46(6.475,-19.475) 47(6.975,-19.475) 48(7.475,-19.475) 49(7.975,-19.475) 50(8.475,-19.475) 51(8.975,-19.475) 52(9.475,-19.475) 53(9.975,-19.475) 54(10.475,-19.475) 55(10.975,-19.475) 56(11.475,-19.475) 57(11.975,-19.475) 58(12.475,-19.475) 59(12.975,-19.475) 60(13.475,-19.475) 61(13.975,-19.475) 62(14.475,-19.475) 63(14.975,-19.475) 64(15.475,-19.475) 65(15.975,-19.475) 66(16.475,-19.475) 67(16.975,-19.475) 68(17.475,-19.475) 69(17.975,-19.475) 70(18.475,-19.475) 71(18.975,-19.475) 72(19.475,-19.475) 109(19.475,1.975) 110(18.975,1.975) 111(18.475,1.975) 112(17.975,1.975) 113(17.475,1.975) 114(16.975,1.975) 115(16.475,1.975) 116(15.975,1.975) 117(15.475,1.975) 118(14.975,1.975) 119(14.475,1.975) 120(13.975,1.975) 121(13.475,1.975) 122(12.975,1.975) 123(12.475,1.975) 124(11.975,1.975) 125(11.475,1.975) 126(10.975,1.975) 127(10.475,1.975) 128(9.975,1.975) 129(9.475,1.975) 130(8.975,1.975) 131(8.475,1.975) 132(7.975,1.975) 133(7.475,1.975) 134(6.975,1.975) 135(6.475,1.975) 136(5.975,1.975) 137(5.475,1.975) 138(4.975,1.975) 139(4.475,1.975) 140(3.975,1.975) 141(3.475,1.975) 142(2.975,1.975) 143(2.475,1.975) 144(1.975,1.975)
  silkscreen extent -0.12,-18.35 20.33,0.85, body extent -0.28,-19.75 21.72,2.25, height 1.63
NX2520SA [mm]
  rect 1.2x1 smd: 1(0,0) 2(1.7,0) 3(1.7,1.3) 4(0,1.3)
  silkscreen extent -0.8,-0.7 2.5,2, body extent -0.4,-0.35 2.1,1.65, height 0.65
NX3215SA [mm]
  rect 1x1.8 smd: 1(0,0) 2(2.5,0)
  silkscreen extent -0.7,-1.1 3.2,1.1, body extent -0.35,-0.75 2.85,0.75, height 0.8
PLD-6 [mm]
  rect 1.6x1.6 hole 1: 1(0,0)
  round 1.6 hole 1: 2(0,2.54) 3(2.54,0) 4(2.54,2.54) 5(5.08,0) 6(5.08,2.54)
  silkscreen extent -1.27,-2.12 6.27,3.81, body extent -1.3,-1.2 6.32,3.8, height 8.5
RES_0603 [mm]
  rect 0.85x0.95 smd: 1(0.025,0) 2(1.575,0)
  silkscreen extent -0.58,-0.65 2.17,0.65, body extent -0.05,-0.48 1.65,0.48, height 0.6
RES_0805 [mm]
  rect 1.27x1.27 smd: 1(0,0) 2(2,0)
  silkscreen extent -0.85,-0.85 2.85,0.85, body extent 0,-0.62 2,0.62, height 0.6
RES_1210 [mm]
  rect 1.6x2.8 smd: 1(-0.025,0.025) 2(2.775,0.025)
  silkscreen extent -1.02,-1.58 3.77,1.63, body extent -0.15,-1.28 2.95,1.33, height 0.57
SOD-323 [mm]
  rect 0.9x0.4 smd: 1(-0.025,0) 2(2.475,0)
  silkscreen extent -1.02,-0.7 3.1,0.72, body extent -0.05,-0.68 2.55,0.67, height 1.1
SOIC-8 [mm]
  rect 1.8x0.6 smd: 1(0,0) 2(0,-1.25) 3(0,-2.55) 4(0,-3.8) 5(6,-3.8) 6(6,-2.55) 7(6,-1.25) 8(6,0)
  silkscreen extent -0.12,-4.38 4.8,0.87, body extent -0.13,-4.37 6.08,0.63, height 1.75
"SOIC-8 EPAD" [mm]
  rect 1.8x0.6 smd: 1(0,0) 2(0,-1.25) 3(0,-2.55) 4(0,-3.8) 5(6,-3.8) 6(6,-2.55) 7(6,-1.25) 8(6,0)
  rect 2.5x3 smd: EPAD(3,-1.9)
  silkscreen extent -0.12,-4.38 4.8,0.88, body extent -0.13,-4.37 6.08,0.63, height 1.75
"SOIC-8 RI-8-1" [mm]
  rect 1.6x0.65 smd: 1(0,0) 2(0,-1.27) 3(0,-2.54) 4(0,-3.81) 5(9.7,-3.81) 6(9.7,-2.54) 7(9.7,-1.27) 8(9.7,0)
  silkscreen extent -0.13,-4.82 8.7,1.02, body extent -0.38,-4.82 9.93,1.03, height 2.65
SOIC-16W [mm]
  rect 2.3x0.6 smd: 1(0,0) 2(0,-1.27) 3(0,-2.54) 4(0,-3.81) 5(0,-5.08) 6(0,-6.35) 7(0,-7.62) 8(0,-8.89) 9(9.6,-8.89) 10(9.6,-7.62) 11(9.6,-6.35) 12(9.6,-5.08) 13(9.6,-3.81) 14(9.6,-2.54) 15(9.6,-1.27) 16(9.6,0)
  silkscreen extent -0.15,-9.9 8.03,1, body extent -0.51,-9.7 10.11,0.8, height 2.62
SOP-16 [mm]
  rect 1.14x0.91 smd: 1(0,0) 2(0,-1.27) 3(0,-2.54) 4(0,-3.81) 5(0,-5.08) 6(0,-6.35) 7(0,-7.62) 8(0,-8.89) 9(6.22,-8.89) 10(6.22,-7.62) 11(6.22,-6.35) 12(6.22,-5.08) 13(6.22,-3.81) 14(6.22,-2.54) 15(6.22,-1.27) 16(6.22,0)
  silkscreen extent -0.1,-9.43 5.3,1, body extent -0.07,-9.44 6.17,0.54, height 1.58
SOT-23-3 [mm]
  rect 1.2x0.55 smd: 1(0,0) 2(0,-1.9) 3(2.15,-0.95)
  silkscreen extent -0.27,-2.5 2,0.65, body extent -0.15,-2.45 2.35,0.55, height 1
SOT-23-5 [mm]
  rect 1.2x0.55 smd: 1(0,0) 2(0,-0.95) 3(0,-1.9) 4(2.15,-1.9) 5(2.15,0)
  silkscreen extent -0.27,-2.5 1.97,0.65, body extent -0.15,-2.45 2.35,0.55, height 1.1
SOT-23-6 [mm]
  rect 1.2x0.55 smd: 1(0,0) 2(0,-0.95) 3(0,-1.9) 4(2.15,-1.9) 5(2.15,-0.95) 6(2.15,0)
  silkscreen extent -0.27,-2.5 1.97,0.65, body extent -0.3,-2.4 2.5,0.5, height 1.18
SOT-89 [mm]
  rect 0.57x1.4 smd: 1(0,0) 3(3,0)
  rect 0.65x1.4 smd: 2(1.5,0)
  Top Layer region: 1.825,0.7 2.5,1.375 2.5,3.825 0.5,3.825 0.5,1.375 1.175,0.7 1.175,-0.7 1.825,-0.7
  Top Layer lines w0.2: 1.5,0 1.5,-0.075
  silkscreen extent -0.82,-0.07 3.75,3, body extent -0.75,-0.43 3.75,3.57, height 1.5
SSO-8 [mm]
  rect 1.905x0.64 smd: 1(0,0) 2(0,-1.275) 3(0,-2.55) 4(0,-3.825) 5(10.75,-3.825) 6(10.75,-2.55) 7(10.75,-1.275) 8(10.75,0)
  silkscreen extent -0.12,-4.82 9,1.02, body extent -0.33,-4.82 11.18,1.03, height 3.61
"TME (SIP-4)" [mm]
  rect 1.4x1.4 hole 0.8: 1(0,0)
  round 1.4 hole 0.8: 2(2.54,0) 3(5.08,0) 4(7.62,0)
  silkscreen extent -1.9,-1.7 9.6,5.4, body extent -1.9,-1.7 9.6,5.4, height 10.2
"TMR3 (SIP-8)" [mm]
  rect 1.3x1.3 hole 0.7: 1(0,0)
  round 1.3 hole 0.7: 2(2.54,0) 3(5.08,0) 5(10.16,0) 6(12.7,0) 7(15.24,0) 8(17.78,0)
  silkscreen extent -2,-5.58 19.8,3.5, body extent -2,-5.6 19.8,3.5, height 11.2
"TMR4 (SIP-8)" [mm]
  rect 1.3x1.3 hole 0.7: 1(0,0)
  round 1.3 hole 0.7: 2(2.54,0) 3(5.08,0) 5(10.16,0) 6(12.7,0) 7(15.24,0) 8(17.78,0)
  silkscreen extent -2,-6.7 19.9,2.5, body extent -2,-6.75 19.8,2.55, height 11.4
TO-252 [mm]
  rect 1.5x2.8 smd: 1(0,0) 3(4.575,0)
  rect 6.3x6.1 smd: 2(2.3,6.2)
  silkscreen extent -1.17,-2.12 5.77,8.93, body extent -0.97,-0.94 5.57,9, height 2.44
WSON-8 [mm]
  rect 0.7x0.25 smd: 1(0,0) 2(0,-0.5) 3(0,-1) 4(0,-1.5) 5(2.1,-1.5) 6(2.1,-1) 7(2.1,-0.5) 8(2.1,0)
  rect 0.9x1.6 smd: 9(1.05,-0.75)
  silkscreen extent -0.05,-1.75 1.55,0.45, body extent 0,-1.75 2.1,0.25, height 0.8